# Allegro board board_before_import.brd
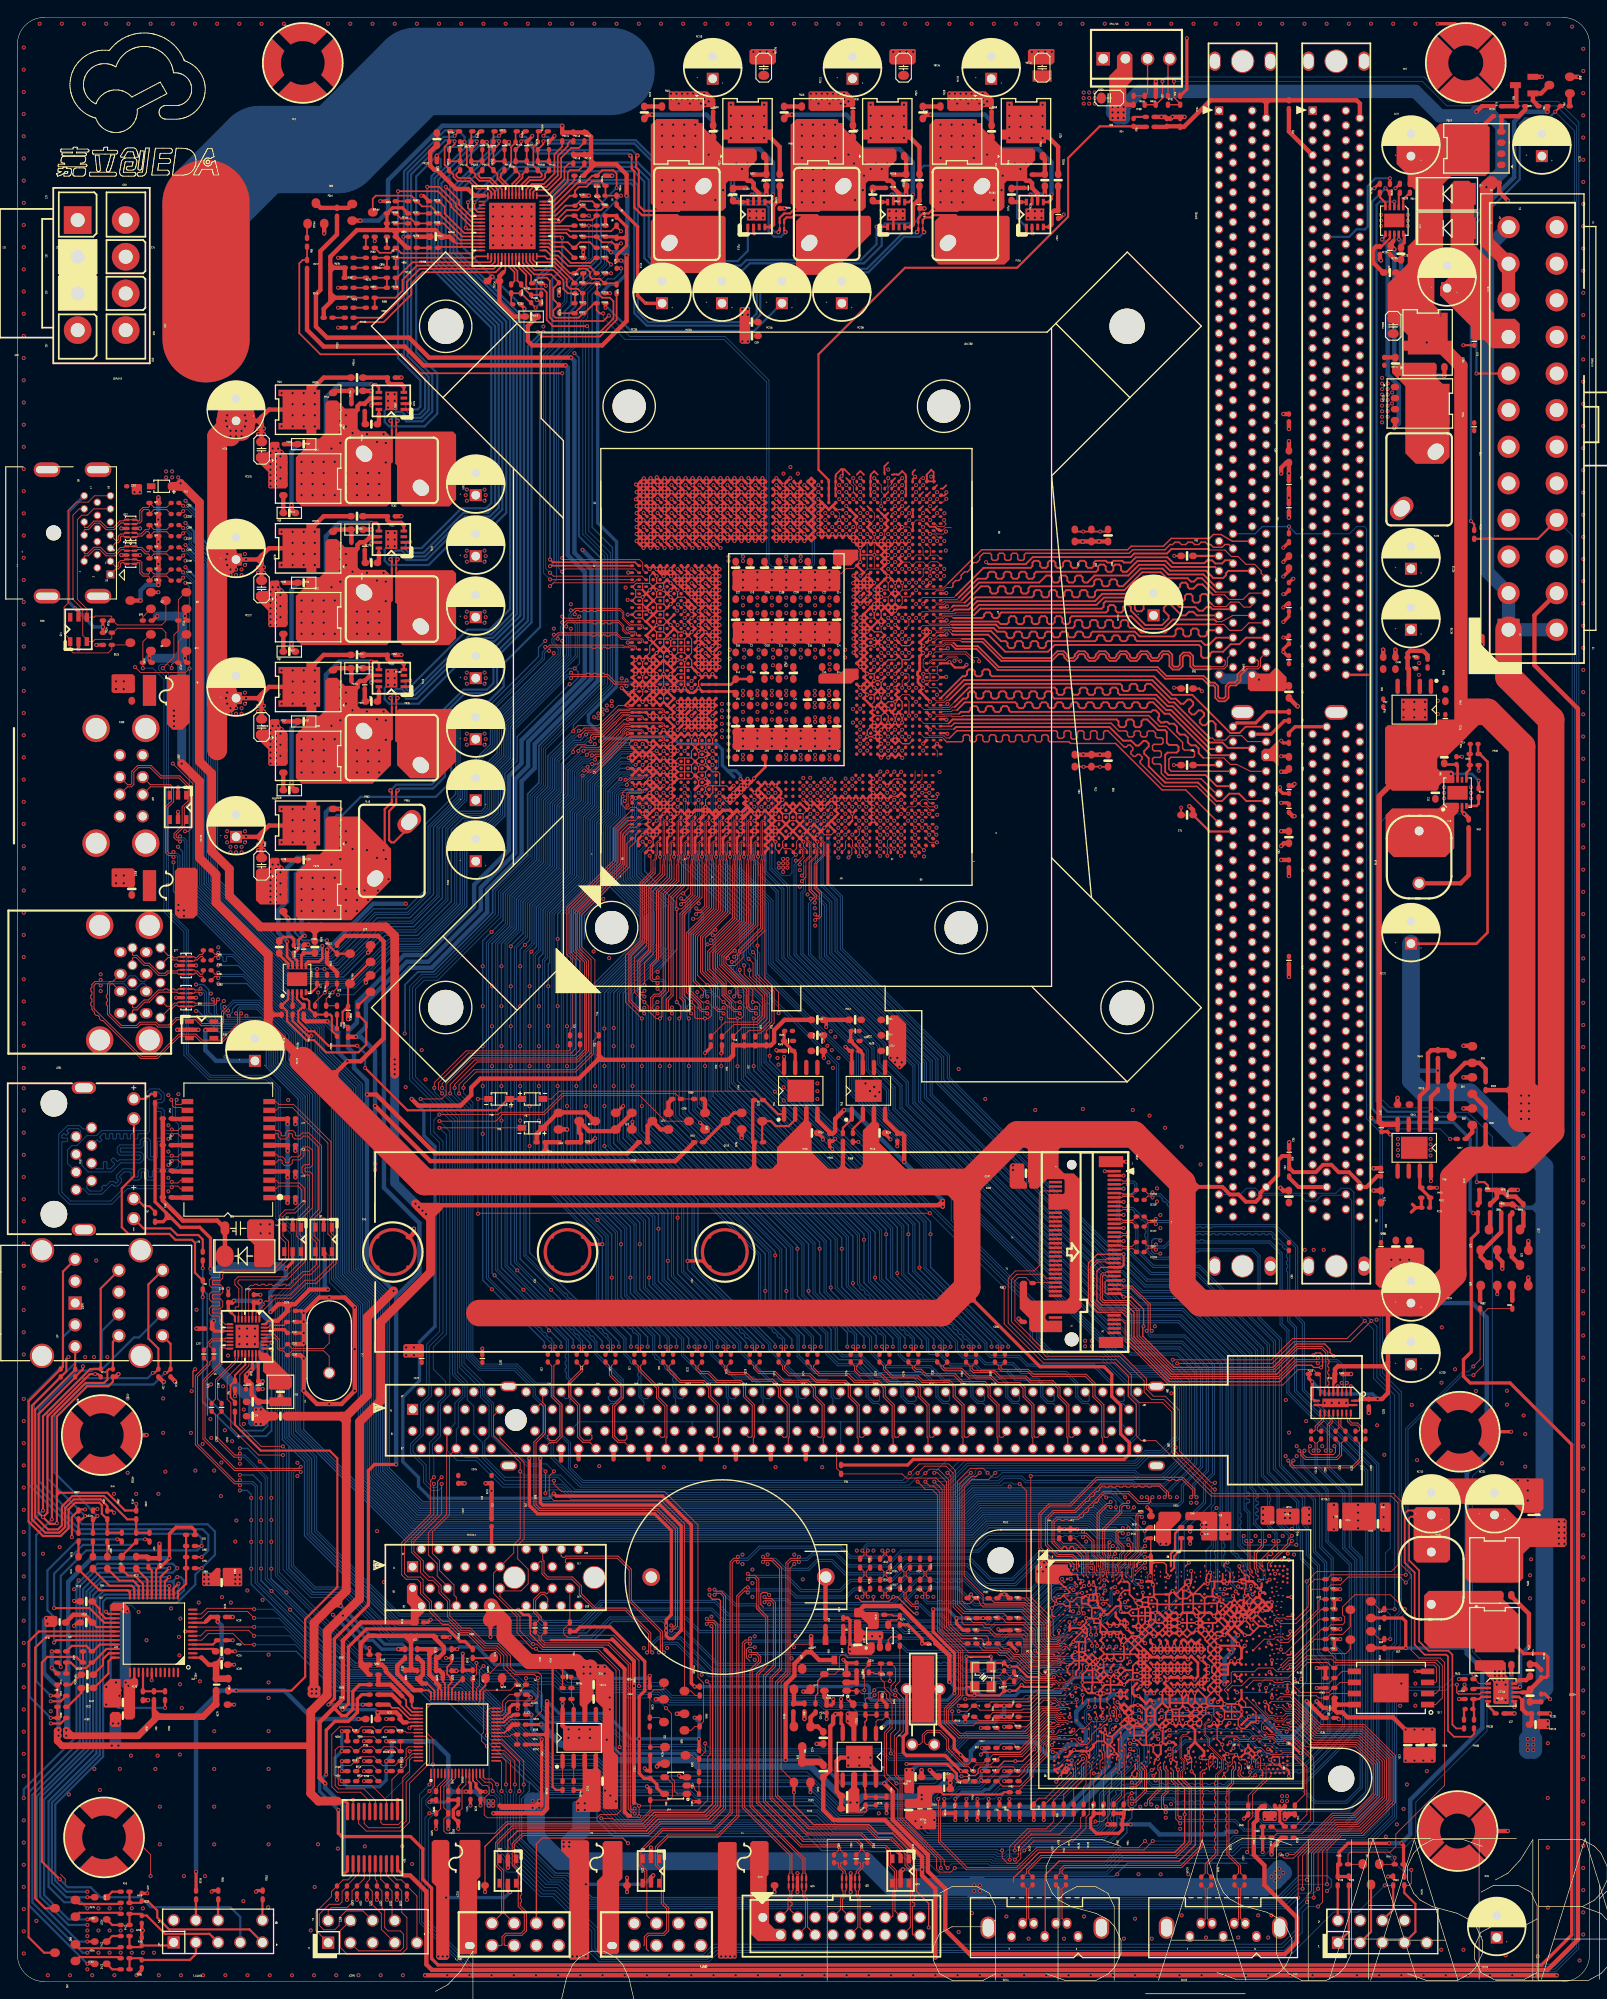
[diagram p0: board, top side]
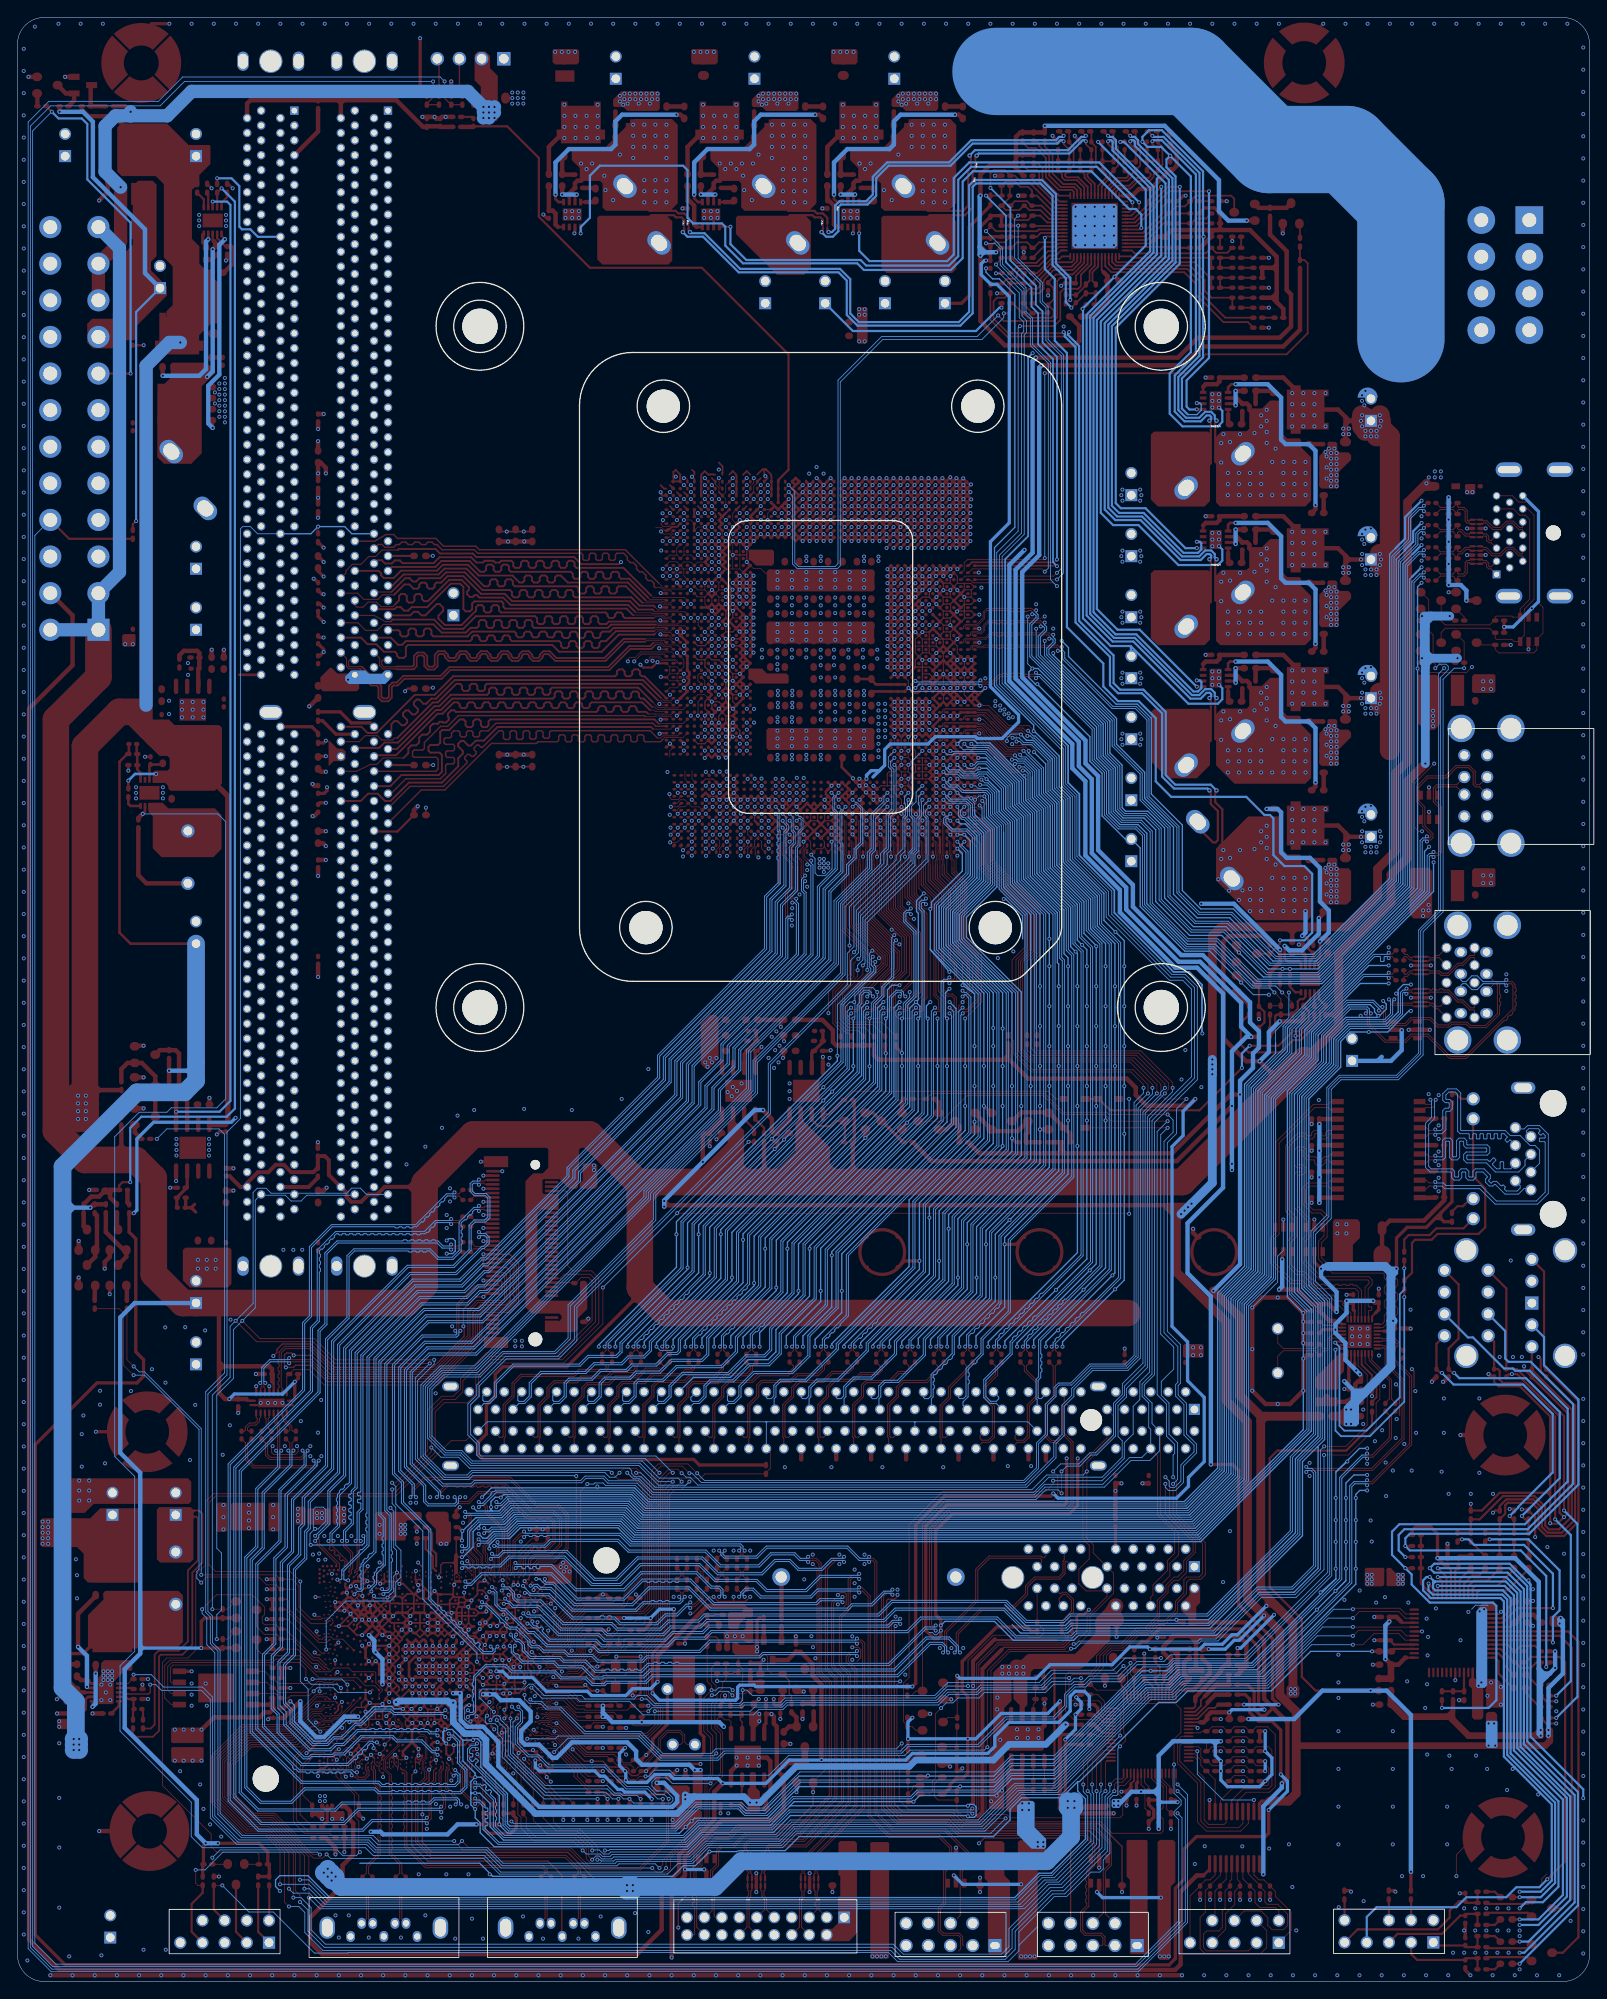
[diagram p1: board, bottom side, seen from below]

Outline 179.95 x 224.87 mm; copper layers: TOP, L2, L3, BOTTOM. Coordinates in mm from the lower left corner of the outline.
Outline path: 0,221.82 arc(0.89,223.98) 3.05,224.87 176.9,224.87 arc(179.06,223.98) 179.95,221.82 179.95,3.05 arc(179.06,0.89) 176.9,0 3.05,0 arc(0.89,0.89) 0,3.05 0,221.82

## Design rules (mm)
constraint set DEFAULT: min track width 0.076

## Placement (name value [footprint] x y rotation side)
AC4  -  [C0603_2]  7.87 43.52 0 top
AC5  -  [C0603_1_8]  11.94 47.96 90 top
AC6  -  [C0603_1_4]  10.29 47.96 90 top
AC7  -  [C0402_11]  4.95 69.68 270 top
AC8  -  [C0402_1_70]  6.6 69.68 270 top
AC11  -  [C0402_1_73]  9.52 69.68 270 top
AC12  -  [C0402_1_71]  10.92 69.68 270 top
AC13  -  [C0603_1_9]  8.64 47.96 90 top
AC14  -  [C0603_1_7]  6.98 47.96 90 top
AC15  -  [C0603_1]  23.37 37.8 0 top
AC16  -  [C0402_1_72]  16.13 69.68 270 top
AC17  -  [C0402_1_69]  17.53 69.68 270 top
AC18  -  [C0603]  23.37 36.28 0 top
AC19  -  [C0402_5]  23.37 41.74 0 top
AC20  -  [C0402_2_6]  12.06 33.36 180 top
AC21  -  [C0603_2_9]  12.06 31.96 180 top
AC22  -  [C0603_1_10]  9.52 7.11 0 top
AC23  -  [C0603_1_11]  9.52 9.65 0 top
AC24  -  [C0402_2_12]  14.22 9.65 90 top
AC25  -  [C0402_2_13]  14.22 7.11 270 top
AC26  -  [C0402_2_5]  23.37 47.07 180 top
AC27  -  [C0603_1_5]  13.59 47.96 90 top
AC28  -  [C0402_2_7]  16.26 47.96 90 top
AC29  -  [C0603_1_6]  23.37 31.71 0 top
AC30  -  [C0603_3_3]  7.87 41.1 180 top
AC104  -  [C0603_3_2]  8 33.61 180 top
AC105  -  [C0603_3_1]  8 35.13 180 top
AFB1  -  [FB0603_2_1]  4.83 41.1 0 top
AFB8  -  [FB0603]  24.13 33.99 90 top
AFB9  -  [FB0603_1_1]  12.06 30.44 0 top
AFB12  -  [FB0603_2_2]  22.73 33.99 270 top
AR2  -  [R0402_16]  19.81 51.14 180 top
AR3  -  [R0402_1_11]  14.99 47.96 90 top
AR4  -  [R0402_2_11]  5.08 37.8 180 top
AR5  -  [R0402_2_12]  8 36.53 0 top
AR7  -  [R0402_13]  8 37.8 0 top
AR8  -  [R0402_14]  5.08 35.26 180 top
AR9  -  [R0402_3_10]  15.62 32.72 270 top
AR36  -  [R0402_1_10]  14.35 32.72 90 top
AR48  -  [R0402_3_29]  12.32 6.48 180 top
AR49  -  [R0402_3_31]  12.32 10.29 180 top
AR71  -  [R0402_1_7]  5.08 32.72 180 top
AR73  -  [R0402_2_17]  13.59 50.88 270 top
AR74  -  [R0402_3_6]  5.08 33.99 0 top
AR75  -  [R0402_3_9]  6.98 50.88 270 top
AR79  -  [R0402_3_7]  5.08 31.45 0 top
AR80  -  [R0402_3_8]  8.64 50.88 270 top
AR82  -  [R0402_2_21]  19.81 49.87 0 top
AR85  -  [R0402_2_18]  11.94 50.88 270 top
AR86  -  [R0402_15]  10.29 53.42 270 top
AR88  -  [R0402_1_8]  6.98 53.42 270 top
AR89  -  [R0402_2_19]  19.81 47.33 0 top
AR90  -  [R0402_2_16]  15.11 50.88 270 top
AR92  -  [R0402_2_13]  5.08 36.53 180 top
AR93  -  [R0402_3_11]  16.89 32.72 270 top
AR94  -  [R0402_2_20]  19.81 48.6 0 top
AR97  -  [R0402_2_15]  10.29 50.88 270 top
AR98  -  [R0402_1_6]  5.08 30.18 180 top
AR103  -  [R0402_2_14]  13.59 53.42 270 top
AR104  -  [R0402_1_9]  8.64 53.42 270 top
ATXPWR1  -  [POWER-PSU-20051014]  176.17 177.82 180 top
ATXPWR2  -  [POWER-2X4P_NHOLD]  6.51 195.33 270 top
AU1  -  [LQFP48]  15.62 39.83 180 top
AU4  -  [QFN60P_7X7MM_GND]  56.64 201 270 top
AUDIO  -  [AUDIO_V]  7.37 77.68 270 top
BAT2  -  [BAT]  81.32 46.31 0 top
BYC3  -  [C0402_1_80]  142.79 19.64 270 top
BYC4  -  [C0402_2]  104.69 38.69 180 top
C1  -  [C0603_2_31]  87.16 149.82 270 top
C2  -  [C0603_1_12]  83.86 152.86 90 top
C3  -  [C0603_2_26]  88.81 161.88 270 top
C4  -  [C0603_2_10]  83.86 161.88 270 top
C5  -  [C0603_2_32]  85.51 149.82 270 top
C6  -  [C0603_2_45]  93.77 143.72 270 top
C7  -  [C0603_1_13]  88.81 152.86 90 top
C8  -  [C0603_1_14]  92.12 152.86 90 top
C9  -  [C0603_9]  84.07 189.99 180 top
C10  -  [C0603_2_38]  90.46 155.91 270 top
C11  -  [C0603_2_27]  87.16 161.88 270 top
C12  -  [C0603_1_15]  92.12 158.96 90 top
C13  -  [C0603_2_25]  90.46 161.88 270 top
C14  -  [C0603_1_16]  93.77 158.96 90 top
C15  -  [C0603_1_17]  87.16 152.86 90 top
C16  -  [C0603_2_34]  83.86 155.91 270 top
C17  -  [C0603_2_30]  88.81 149.82 270 top
C18  -  [C0603_1_18]  82.21 152.86 90 top
C19  -  [C0603_3_6]  84.07 188.42 180 top
C20  -  [C0603_1_19]  90.46 158.96 90 top
C21  -  [C0603_2_24]  92.12 161.88 270 top
C22  -  [C0603_1_20]  82.21 158.96 90 top
C23  -  [C0603_2_28]  85.51 161.88 270 top
C24  -  [C0603_1_21]  93.77 152.86 90 top
C25  -  [C0603_1_22]  92.12 140.8 90 top
C26  -  [C0603_1_23]  93.77 140.8 90 top
C27  -  [C0603_2_13]  92.08 146.77 270 top
C28  -  [C0603_1_24]  88.81 140.8 90 top
C29  -  [C0603_1_25]  90.46 140.8 90 top
C30  -  [C0603_1_26]  87.16 140.8 90 top
C31  -  [C0603_2_12]  93.73 146.77 270 top
C32  -  [C0603_2_29]  82.21 161.88 270 top
C33  -  [C0603_2_33]  82.21 155.91 270 top
C34  -  [C0603_2_39]  92.12 155.91 270 top
C35  -  [C0603_2_48]  88.81 143.72 270 top
C36  -  [C0603_1_27]  90.46 152.86 90 top
C37  -  [C0603_2_41]  87.16 143.72 270 top
C38  -  [C0603_2_40]  93.77 155.91 270 top
C40  -  [C0603_1_28]  83.86 158.96 90 top
C41  -  [C0603_1_29]  88.81 146.77 90 top
C42  -  [C0603_2_23]  93.77 161.88 270 top
C43  -  [C0603_1_30]  82.21 149.82 90 top
C44  -  [C0603_1_31]  93.77 149.82 90 top
C45  -  [C0603_1_32]  92.12 149.82 90 top
C46  -  [C0603_2_11]  90.42 146.77 270 top
C48  -  [C0603_2_47]  90.46 143.72 270 top
C49  -  [C0603_2_42]  85.51 143.72 270 top
C50  -  [C0603_2_46]  92.12 143.72 270 top
C51  -  [C0603_1_33]  85.51 146.77 90 top
C52  -  [C0603_1_34]  83.86 140.8 90 top
C53  -  [C0603_2_43]  83.86 143.72 270 top
C54  -  [C0603_2_44]  82.21 143.72 270 top
C55  -  [C0603_1_35]  82.21 146.77 90 top
C56  -  [C0603_1_36]  87.16 146.77 90 top
C57  -  [C0603_1_37]  83.86 146.77 90 top
C58  -  [C0603_1_38]  82.21 140.8 90 top
C59  -  [C0603_1_39]  85.51 140.8 90 top
C60  -  [C0603_2_15]  124.84 139.78 270 top
C61  -  [C0603_10]  133.88 139.27 180 top
C62  -  [C0603_1_40]  121.03 165.56 90 top
C63  -  [C0603_11]  133.88 148.04 180 top
C64  -  [C0603_12]  133.88 163.23 180 top
C65  -  [C0603_1_41]  122.94 165.56 90 top
C66  -  [C0402_2_24]  127.76 212.85 90 top
C67  -  [C0402_1_57]  131.57 212.85 90 top
C68  -  [C0603_1_42]  145.54 139.53 90 top
C69  -  [C0603_1_43]  145.54 174.58 270 top
C70  -  [C0402_3_27]  145.54 157.31 90 top
C71  -  [C0402_1_63]  145.54 179.03 90 top
C72  -  [C0402_3_28]  145.54 153.63 90 top
C73  -  [C0402_3_26]  145.54 116.92 90 top
C74  -  [C0402_3_30]  145.54 136.48 270 top
C75  -  [C0603_13]  133.88 133.56 0 top
C76  -  [C0603_1_44]  122.94 139.78 90 top
C77  -  [C0603_2_16]  145.54 147.66 270 top
C78  -  [C0402_3_29]  145.54 151.34 90 top
C79  -  [C0402_3_36]  156.08 92.67 90 top
C80  -  [C0603_1_45]  156.08 89.87 90 top
C81  -  [C0402_3_37]  156.08 84.16 270 top
C82  -  [C0603_1_46]  145.54 162.52 90 top
C83  -  [C0603_1_47]  121.03 139.78 90 top
C84  -  [C0402_1_61]  145.54 127.97 270 top
C85  -  [C0402_3_32]  145.54 168.74 270 top
C86  -  [C0402_3_34]  145.54 171.41 90 top
C87  -  [C0402_1_62]  145.54 159.72 90 top
C88  -  [C0402_3_31]  145.54 134.32 90 top
C89  -  [C0603_2_14]  124.84 165.56 270 top
C90  -  [C0603_2_17]  145.54 131.02 90 top
C91  -  [C0603_1_48]  156.34 150.96 90 top
C92  -  [C0402_1_64]  156.34 146.39 270 top
C93  -  [C0402_3_35]  145.57 94.95 90 top
C94  -  [C0603_2_19]  145.54 89.87 90 top
C95  -  [C0402_1_67]  145.54 84.16 270 top
C98  -  [C0402_2_39]  109.01 25.36 0 top
C99  -  [C0402_12]  109.01 24.09 0 top
C100  -  [C0402_3_49]  150.24 31.32 0 top
C101  -  [C0603_3]  99.57 110.11 0 top
C102  -  [C0603_1_49]  85.51 152.86 90 top
C103  -  [C0402_2_2]  114.09 24.09 180 top
C104  -  [C0603_2_35]  85.51 155.91 270 top
C105  -  [C0603_1_50]  85.51 158.96 90 top
C106  -  [C0603_1_51]  83.86 149.82 90 top
C107  -  [C0603_3_7]  92.24 24.09 90 top
C108  -  [C0603_1_52]  87.16 158.96 90 top
C109  -  [C0603_1_53]  88.81 158.96 90 top
C110  -  [C0603_2_36]  87.16 155.91 270 top
C111  -  [C0603_2_37]  88.81 155.91 270 top
C141  -  [C0402_3_50]  90.85 38.18 90 top
C187  -  [C0402_2_55]  78.02 21.04 270 top
C188  -  [C0402_2_54]  96.05 36.02 90 top
C194  -  [C0402_13]  18.03 160.4 0 top
C195  -  [C0402_14]  18.03 161.67 0 top
C196  -  [C0402_15]  18.03 164.21 0 top
C197  -  [C0402_16]  18.03 165.48 0 top
C198  -  [C0402_17]  18.03 162.94 0 top
C199  -  [C0402_18]  18.03 166.75 0 top
C200  -  [C0402_19]  18.03 168.02 0 top
C201  -  [C0402_20]  18.03 169.29 0 top
C202  -  [C0402_21]  12.95 171.2 0 top
C221  -  [C0603_1_54]  85.98 11 0 top
C223  -  [C0603_2_21]  52.83 11 0 top
C224  -  [C0603_1_55]  69.09 11 0 top
C225  -  [C0402_1_46]  112.94 36.02 90 top
C226  -  [C0603_14]  26.92 64.73 0 top
C227  -  [C0402_22]  21.84 74.76 0 top
C228  -  [C0402_3_47]  27.56 68.28 90 top
C229  -  [C0402_2_32]  31.37 76.79 180 top
C230  -  [C0402_23]  31.37 71.71 0 top
C231  -  [C0402_24]  31.37 72.98 0 top
C232  -  [C0603_3_8]  26.92 66.38 0 top
C233  -  [C0402_3_46]  26.16 68.28 90 top
C234  -  [C0402_2_31]  31.37 74.25 180 top
C235  -  [C0402_1_74]  27.05 78.19 270 top
C236  -  [C0402_1_75]  24.13 78.19 270 top
C237  -  [C0402_3_43]  21.34 71.84 90 top
C238  -  [C0402_3_42]  22.48 71.84 90 top
C239  -  [C0402_3_45]  22.23 65.74 90 top
C240  -  [C0402_3_44]  23.37 65.74 90 top
C241  -  [C0603_1_56]  9.52 4.57 0 top
C242  -  [C0603_1_57]  9.52 2.03 0 top
C243  -  [C0402_2_14]  14.22 4.57 90 top
C244  -  [C0402_2_15]  14.22 2.03 270 top
C245  -  [C0603_2_22]  66.97 22.94 0 top
C246  -  [C0402_3_7]  112.94 33.74 270 top
C273  -  [C0402_25]  57.7 31.71 180 top
C274  -  [C0603_3_9]  92.24 27.9 270 top
C313  -  [C0402_2_56]  72.43 23.7 90 top
C314  -  [C0402_2_52]  92.62 31.2 270 top
C319  -  [C0402_2_35]  36.58 10.5 270 top
C320  -  [C0402_26]  38.86 10.5 270 top
C321  -  [C0402_27]  41.15 10.5 270 top
C322  -  [C0402_2_36]  37.72 10.5 270 top
C323  -  [C0402_28]  43.43 10.5 270 top
C324  -  [C0402_29]  40.01 10.5 270 top
C325  -  [C0402_1_47]  154.69 66.25 270 top
C326  -  [C0402_2_33]  115.7 91.14 180 top
C327  -  [C0402_30]  42.29 10.5 270 top
C328  -  [C0402_31]  44.58 10.5 270 top
C329  -  [C0402_6]  64.9 96.09 0 top
C330  -  [C0603_3_10]  115.44 92.54 180 top
C333  -  [C0402_3_6]  53.21 71.33 90 top
C334  -  [C0402_8]  151.26 69.55 0 top
C350  -  [C0402_2_34]  115.7 75.52 180 top
C358  -  [C0603_15]  13.08 125.09 90 top
C359  -  [C0603_1_58]  13.08 147.32 90 top
C360  -  [C0402_1_49]  93.47 14.05 270 top
C361  -  [C0402_1_48]  94.74 14.05 270 top
C362  -  [C0402_3_41]  96.01 14.05 90 top
C363  -  [C0402_3_8]  97.28 14.05 90 top
C380  -  [C0402_2_21]  48.01 207.9 90 top
C381  -  [C0603_2_53]  96.18 38.56 90 top
C382  -  [C0603_1_59]  96.18 41.61 270 top
C383  -  [C0402_32]  21.72 114.64 0 top
C384  -  [C0402_33]  21.72 115.78 0 top
C385  -  [C0402_34]  21.72 116.92 0 top
C386  -  [C0402_35]  21.72 118.07 0 top
C491  -  [C0603_1_60]  163.45 147.28 90 top
C492  -  [C0402_3_48]  156.12 97.75 90 top
C493  -  [C0603_2_49]  157.77 84.16 270 top
C494  -  [C0603_2_50]  159.3 84.16 270 top
C495  -  [C0603_1_61]  158.66 100.41 180 top
C496  -  [C0603_1_62]  157.73 150.96 90 top
C635  -  [C0805]  124.97 215.65 0 top
CC1  -  [C0603_2_18]  162.31 136.1 270 top
CN1  -  [SMD_BD5_6-D3_6]  62.97 83.52 90 top
CN2  -  [SMD_BD5_6-D3_6_1]  80.96 83.52 90 top
CN3  -  [SMD_BD5_6-D3_6_2]  42.97 83.52 0 top
CPU1  -  [LGA1700-HS]  88.02 150.52 90 top
CPU_FAN  -  [FAN4P]  128.09 220.21 0 top
D2  -  [DIODE_1N5817_4148]  163.7 200.74 0 top
D4  -  [SOT23_123_2]  154.94 12.27 180 top
D5  -  [DIODE_1N5817_4148_1]  163.7 204.68 0 top
D67  -  [SOT23_124_1]  5.46 3.3 90 top
D69  -  [SOT23_124]  5.46 8.38 90 top
D85  -  [SOT23_125_2]  89.83 23.96 0 top
DIMMA1  -  [DDR4-288P-AKL_1]  140.24 150.91 270 top
DIMMB1  -  [DDR4-288P-AKL_1_1]  150.96 150.91 270 top
EC1  -  [C0402_1_13]  61.85 71.37 270 top
EC2  -  [C0402_1_11]  60.71 71.37 270 top
EC3  -  [C0402_1_14]  65.15 71.37 270 top
EC4  -  [C0402_1_12]  64.01 71.37 270 top
EC5  -  [C0402_1_37]  68.45 71.37 270 top
EC6  -  [C0402_1_20]  67.31 71.37 270 top
EC7  -  [C0402_1_29]  70.61 71.37 270 top
EC8  -  [C0402_1_31]  71.75 71.37 270 top
EC9  -  [C0402_1_35]  73.91 71.37 270 top
EC10  -  [C0402_1_18]  75.06 71.37 270 top
EC11  -  [C0402_1_25]  77.22 71.37 270 top
EC12  -  [C0402_1_16]  78.36 71.37 270 top
EC13  -  [C0402_1_30]  80.52 71.37 270 top
EC14  -  [C0402_1_15]  81.66 71.37 270 top
EC17  -  [C0402_1_52]  46.05 41.12 0 top
EC19  -  [C0402_1_22]  83.82 71.37 270 top
EC20  -  [C0402_1_81]  54.27 52.53 90 top
EC22  -  [C0402_1_7]  50.46 57.49 270 top
EC23  -  [C0402_3_5]  46.27 71.33 90 top
EC24  -  [C0402_1_17]  91.57 71.37 270 top
EC25  -  [C0402_1_44]  152.02 62.57 270 top
EC26  -  [C0402_1_43]  150.88 62.57 270 top
EC27  -  [C0402_1_45]  153.16 62.57 270 top
EC28  -  [C0402_1_40]  154.3 62.57 270 top
EC37  -  [C0402_2_44]  140.46 11.51 90 top
EC38  -  [C0402_2_43]  139.32 11.51 90 top
EC39  -  [C0402_2_42]  136.65 11.51 90 top
EC40  -  [C0402_2_41]  135.51 11.51 90 top
EC41  -  [C0402_2_46]  120.02 11.51 90 top
EC42  -  [C0402_2_45]  118.87 11.51 90 top
EC43  -  [C0402_2_48]  116.2 11.51 90 top
EC44  -  [C0402_2_47]  115.06 11.51 90 top
EC45  -  [C0402_1_6]  54.27 57.49 270 top
EC46  -  [C0402_1_28]  84.96 71.37 270 top
EC47  -  [C0402_1_39]  106.43 71.37 270 top
EC49  -  [C0402_1_76]  54.14 40.98 270 top
EC57  -  [C0402_2_27]  128.52 84.66 180 top
EC68  -  [C0402_1_33]  88.27 71.37 270 top
EC69  -  [C0402_1_23]  99.82 71.37 270 top
EC72  -  [C0402_1_38]  87.12 71.37 270 top
EC73  -  [C0402_1_32]  96.52 71.37 270 top
EC74  -  [C0402_1_24]  90.42 71.37 270 top
EC75  -  [C0402_1_34]  98.68 71.37 270 top
EC76  -  [C0402_1_27]  95.38 71.37 270 top
EC77  -  [C0402_1_26]  103.12 71.37 270 top
EC78  -  [C0402_1_19]  101.98 71.37 270 top
EC79  -  [C0402_1_10]  113.03 71.37 270 top
EC80  -  [C0402_1_9]  109.73 71.37 270 top
EC81  -  [C0402_1_36]  105.28 71.37 270 top
EC82  -  [C0402_1_8]  111.89 71.37 270 top
EC83  -  [C0402_1_21]  108.59 71.37 270 top
EC87  -  [C0402_1_42]  149.22 62.57 270 top
EC110  -  [C0402_2_28]  128.52 83.52 180 top
EC112  -  [C0402_2_30]  128.52 86.44 180 top
EC115  -  [C0402_2_29]  128.52 87.59 180 top
EC116  -  [C0402_2_25]  128.52 90.63 180 top
EC119  -  [C0402_2_26]  128.52 89.49 180 top
EC120  -  [C0402_1_41]  148.08 62.57 270 top
ECT6  -  [EC1P25C_2]  163.64 195.15 90 top
ECT7  -  [EC1P25C_2_1]  159.51 210.27 90 top
ECT9  -  [EC1P25C_2_2]  159.51 78.95 90 top
ECT10  -  [EC1P25C_2_3]  169.33 6.31 90 top
ECT11  -  [EC1P25C_2_4]  174.5 210.27 90 top
ECT20  -  [EC1P25C_2_5]  159.51 71.93 90 top
F4  -  [MINISMDC110]  83.19 14.18 0 top
F5  -  [MINISMDC110_1]  50.16 14.18 0 top
F6  -  [MINISMDC110_2]  66.29 14.18 0 top
F7  -  [MINISMDC110_3]  17.02 125.48 0 top
F8  -  [MINISMDC110_4]  17.02 147.83 0 top
F_AUDIO1  -  [PIN2X5_2D54_NC8]  22.96 5.75 0 top
F_USB1  -  [HDR-TH_10P-P2_54_210-82-05GB04]  56.86 5.39 0 top
F_USB2  -  [HEADER10X2_2MM_USB3_A]  94.32 6.34 0 top
F_USB3  -  [unnamed]  73.15 5.39 0 top
FB1  -  [FB0603_1_2]  40.55 30.05 0 top
FB23  -  [FB0603_1]  133.48 53.3 180 top
FB24  -  [FB0603_2_3]  106.09 22.05 0 top
FB25  -  [FB0603_2]  102.8 22.03 180 top
FC1  -  [C0402_1_60]  169.16 205.95 0 top
FC3  -  [C0402_3_24]  166.75 178.01 90 top
FC4  -  [C0402_1_65]  166.75 154.39 270 top
FC5  -  [C0402_3_23]  166.75 187.79 270 top
GR1  -  [R0402_2_50]  15.62 169.29 0 top
GR2  -  [R0402_2_54]  15.62 168.02 0 top
GR3  -  [R0402_2_55]  15.62 166.75 0 top
GR4  -  [R0402_2_56]  15.62 165.48 0 top
GR5  -  [R0402_2_57]  15.62 164.21 0 top
GR6  -  [R0402_2_53]  15.62 162.94 0 top
GR7  -  [R0402_2_51]  15.62 161.67 0 top
GR8  -  [R0402_2_52]  15.62 160.4 0 top
GR9  -  [R0402_3_44]  14.86 155.83 180 top
HDMI  -  [HDMI3F19_2H61_AKL]  4.99 165.86 270 top
JCOM1  -  [PIN2X5_2D54_NC10]  40.65 5.71 0 top
JFP1  -  [PIN2X5_2D54_NC10_1]  156.24 5.72 0 top
LAN1  -  [RJ45_LED]  7.09 94.2 270 top
LC1  -  [C0402_36]  31.37 98.81 0 top
LC2  -  [C0402_37]  31.37 95.76 0 top
LC3  -  [C0402_38]  31.37 92.71 0 top
LC4  -  [C0402_39]  31.37 89.79 0 top
LC5  -  [C1206]  25.27 86.23 180 top
LL1  -  [L1210H22]  30.1 67.52 0 top
LQ1  -  [SOT23-6P-20051228]  35.05 84.96 180 top
LQ2  -  [SOT23-6P-20051228_1]  31.5 84.96 180 top
LR1  -  [R0603_2]  30.1 64.73 180 top
LR2  -  [R0402_120]  31.37 75.52 180 top
LR3  -  [R0603_1_1]  30.1 67.52 270 top
LR4  -  [R0402_1_70]  24.89 65.74 90 top
LR5  -  [R0402_3_74]  24.89 68.28 270 top
LR6  -  [R0402_3_39]  21.21 83.06 270 top
LR7  -  [R0402_1_24]  15.75 87.5 270 top
LR8  -  [R0402_1_28]  21.21 79.76 90 top
LR9  -  [R0402_1_25]  15.75 101.09 270 top
LR11  -  [R0402_3_38]  17.14 89.79 180 top
LR12  -  [R0402_1_23]  17.14 92.84 180 top
LR13  -  [R0402_1_26]  17.14 95.76 180 top
LR14  -  [R0402_1_27]  17.14 98.81 180 top
LU1  -  [TRAN24_100_150]  24.13 95.25 90 top
LY1  -  [XD2]  35.69 74.76 270 top
MC6  -  [C0402_1_66]  164.72 139.78 270 top
MC97  -  [C0402_1_68]  31.62 118.19 270 top
MC98  -  [C0402_2_11]  30.1 128.4 180 top
MC99  -  [C0402_3_39]  32.77 118.19 90 top
MC100  -  [C0402_2_40]  174.41 35.26 270 top
MC101  -  [C0402_10]  173.78 30.69 0 top
MC102  -  [C0402_1_78]  174.41 32.47 90 top
MC103  -  [C0402_1_58]  156.46 185.5 270 top
MC104  -  [C0402_1_59]  155.96 198.2 270 top
MC105  -  [C0402_3_25]  157.1 198.2 90 top
MCT11  -  [EC1P25C_2_18]  52.45 129.54 90 top
MCT12  -  [EC1P25C_2_6]  161.84 54.69 90 top
MCT13  -  [EC1P25C_2_7]  159.51 163.02 90 top
MCT14  -  [EC1P25C_2_12]  52.45 136.53 90 top
MCT15  -  [EC1P25C_2_8]  130.05 157.69 90 top
MCT16  -  [EC1P25C_2_9]  159.51 156.04 90 top
MCT20  -  [EC1P25C_2_10]  25.02 132.33 90 top
MCT21  -  [EC1P25C_2_11]  169.08 54.69 90 top
MH1  -  [MTH_156A]  32.66 219.67 0 top
MH2  -  [MTH_156A_1]  165.1 62.95 0 top
MH3  -  [MTH_156A_2]  9.91 16.5 0 top
MH4  -  [MTH_156A_3]  9.65 62.57 0 top
MH5  -  [MTH_156A_1_1]  164.85 17.23 0 top
MH7  -  [MTH_156A_2_1]  165.79 219.67 0 top
MR1  -  [R0603_1_2]  163.32 140.16 90 top
MR2  -  [R0402_1_80]  166.12 132.54 90 top
MR3  -  [R0402_113]  166.75 139.27 180 top
MR13  -  [R0402_3_25]  98.34 31.07 270 top
MR107  -  [R0402_115]  34.07 111.22 270 top
MR108  -  [R0603_2_3]  29.97 118.45 90 top
MR109  -  [R0603_3]  32.77 128.4 0 top
MR110  -  [R0603_2_4]  34.04 118.45 90 top
MR111  -  [R0402_2_100]  35.43 114.76 270 top
MR112  -  [R0402_3_71]  38.99 111.21 90 top
MR113  -  [R0402_35]  166.16 32.34 0 top
MR114  -  [R0603]  173.14 35.64 90 top
MR115  -  [R0603_2_2]  173.14 32.72 90 top
MR116  -  [R0603_1]  173.78 29.42 0 top
MR117  -  [R0603_1_3]  157.73 185.25 270 top
MR118  -  [R0402_3_80]  170.47 90.63 180 top
MR119  -  [R0603_1_4]  157.1 195.66 0 top
MR120  -  [R0603_1_5]  158.37 197.82 270 top
PC11  -  [C0402_3_40]  95.89 108.84 0 top
PC12  -  [C0603_3_5]  99.57 106.55 0 top
PC13  -  [C0603_3_4]  95.89 110.11 180 top
PC14  -  [C0603_4]  99.57 108.33 0 top
PC15  -  [C0603_8]  98.68 97.16 0 top
PC16  -  [C0603_6]  91.57 110.11 0 top
PC17  -  [C0603_5]  91.57 108.33 0 top
PC18  -  [C0603_2_20]  91.57 106.55 0 top
PC19  -  [C0402_7]  88.27 108.84 0 top
PC20  -  [C0603_7]  90.93 97.16 0 top
PC22  -  [C0402_3_33]  163.45 144.61 90 top
PC23  -  [C0402_40]  159.64 150.32 0 top
PC24  -  [C0402_2_49]  161.2 88.6 180 top
PC25  -  [C0603_2_51]  94.97 19.81 180 top
PC26  -  [C0402_1_82]  98.27 20.66 270 top
PC28  -  [C0402_1_51]  100.71 96.65 90 top
PC29  -  [C0402_2_18]  68.58 196.6 270 top
PC30  -  [C0402_41]  66.8 194.44 180 top
PC31  -  [C0402_1_50]  92.96 96.65 90 top
PC32  -  [C0805_1]  27.94 127.76 90 top
PC33  -  [C0402_2_53]  94.27 31.07 270 top
PC34  -  [C0603_1_63]  95.67 31.07 90 top
PC35  -  [C0603_2_52]  94.97 21.26 180 top
PC36  -  [C0805_1_1]  173.65 53.42 270 top
PC37  -  [C0603_3_11]  65.95 32.34 0 top
PC38  -  [C0603_3_12]  65.95 33.99 0 top
PC57  -  [C0402_2_9]  30.1 144.27 180 top
PC58  -  [C0402_2_10]  30.1 160.15 180 top
PC59  -  [C0402_2_8]  30.1 176.02 180 top
PC60  -  [C0402_3_19]  79.63 214.5 90 top
PC61  -  [C0402_3_20]  95.63 214.5 90 top
PC62  -  [C0402_42]  42.8 151.89 0 top
PC63  -  [C0402_43]  42.8 167.77 0 top
PC64  -  [C0402_1_54]  42.8 183.64 0 top
PC65  -  [C0402_44]  87.25 203.45 270 top
PC66  -  [C0402_3_22]  103.25 203.45 270 top
PC67  -  [C0402_3_18]  119.13 202.31 270 top
PC68  -  [C0402_3_21]  111.51 214.5 90 top
PC92  -  [C0402_3_51]  62.91 34.88 180 top
PC105  -  [C0402_45]  169.42 213.57 0 top
PC151  -  [C0402_46]  64.26 204.47 0 top
PC152  -  [C0402_47]  61.98 194.06 270 top
PC155  -  [C0603_1_64]  54.48 194.69 0 top
PC167  -  [C0402_3_13]  54.48 210.19 270 top
PC168  -  [C0402_3_15]  51.94 210.19 270 top
PC169  -  [C0402_3_9]  39.75 148.46 90 top
PC170  -  [C0805_2]  27.94 143.64 90 top
PC171  -  [C0402_3_10]  39.75 164.34 90 top
PC172  -  [C0805_3]  27.94 159.51 90 top
PC173  -  [C0402_48]  49.4 210.19 270 top
PC174  -  [C0402_1_53]  39.75 180.21 90 top
PC175  -  [C0805_4]  27.94 175.39 90 top
PC176  -  [C0402_1_55]  57.02 210.19 270 top
PC177  -  [C0402_2_23]  83.82 205.36 0 top
PC178  -  [C0805_5]  85.43 219.13 270 top
PC179  -  [C0402_2_16]  59.56 210.19 270 top
PC180  -  [C0402_49]  99.82 205.36 0 top
PC181  -  [C0805_6]  101.43 219.13 270 top
PC182  -  [C0402_1_56]  58.8 192.66 270 top
PC183  -  [C0402_3_17]  115.7 205.36 0 top
PC184  -  [C0805_2_1]  117.3 219.13 270 top
PC185  -  [C0805_7]  157.48 189.57 90 top
PC226  -  [C0402_2_17]  66.8 204.47 0 top
PC229  -  [C0402_2_22]  45.21 199.77 180 top
PC230  -  [C0402_2_20]  61.98 191.52 90 top
PC231  -  [C0402_2_19]  64.26 193.29 0 top
PC232  -  [C0402_50]  64.26 203.33 0 top
PC233  -  [C0402_51]  57.15 192.02 0 top
PC235  -  [C0402_52]  60.83 210.19 90 top
PC237  -  [C0402_3_14]  55.75 210.19 90 top
PC239  -  [C0402_3_12]  53.21 210.19 90 top
PC240  -  [C0402_3_16]  50.67 210.19 90 top
PC241  -  [C0402_3_11]  58.29 210.19 90 top
PC243  -  [C0402_53]  66.8 193.29 0 top
PC244  -  [C0402_2_57]  72.43 26.37 270 top
PC245  -  [C0402_3_38]  37.85 111.21 270 top
PCH2  -  [BGA1045_28X25MM-ADL]  132.03 35.72 0 top
PCIEX1_1  -  [3GIO_X1-20060619]  55.97 46.26 90 top
PCT7  -  [EC1P25C_2_19]  25.02 148.21 90 top
PCT8  -  [EC1P25C_2_20]  25.02 164.08 90 top
PCT9  -  [EC1P25C_1]  25.02 179.96 90 top
PCT10  -  [EC1P25C_2_21]  79.58 219.13 90 top
PCT11  -  [EC1P25C_2_22]  95.59 219.13 90 top
PCT12  -  [EC1P25C_2_23]  111.46 219.13 90 top
PCT16  -  [EC1P25C_2_24]  87.5 193.42 90 top
PCT21  -  [EC1P25C_2_25]  159.51 120.1 90 top
PCT23  -  [EC1P25C_2_26]  27.18 106.68 90 top
PCT28  -  [EC1P25C_2_27]  94.36 193.42 90 top
PCT29  -  [EC1P25C_2_14]  52.45 150.5 90 top
PCT30  -  [EC1P25C_2_15]  52.45 157.48 90 top
PCT31  -  [EC1P25C_2_13]  52.45 143.51 90 top
PCT32  -  [EC1P25C_2_16]  52.45 164.47 90 top
PCT33  -  [EC1P25C_2_28]  80.64 193.42 90 top
PCT34  -  [EC1P25C_2_17]  52.45 171.45 90 top
PCT35  -  [EC1P25C_2_29]  73.79 193.42 90 top
PD3  -  [1N4148WS-7-SOD323]  16.51 171.2 180 top
PD5  -  [DIODE_1N5817]  26.03 83.06 0 top
PD6  -  [1N4148WS-7-SOD323_1]  58.93 97.75 180 top
PD7  -  [1N4148WS-7-SOD323_1_1]  58.93 101.05 0 top
PD8  -  [1N4148WS-7-SOD323_2]  55.12 101.05 180 top
PEX16_1  -  [3GIO_X16_AIR_KORTAK_AKL]  155.72 51.2 90 top
PL10  -  [MAGIC_R22]  42.93 141.22 270 top
PL11  -  [MAGIC_R22_1]  42.93 157.1 270 top
PL12  -  [MAGIC_R22_2]  42.93 172.97 270 top
PL13  -  [MAGIC_R22_3]  76.58 202.31 180 top
PL14  -  [MAGIC_R22_4]  92.58 202.31 180 top
PL15  -  [MAGIC_R22_5]  108.46 202.31 180 top
PL16  -  [MAGIC_R22_6]  42.9 129.54 0 top
PL18  -  [MAGIC_R22_7]  160.4 171.91 180 top
PL19  -  [CHOKE2U8-20A_3P]  160.45 128.73 90 top
PL20  -  [CHOKE2U8-20A_3P_1]  161.84 46.18 270 top
PQ7  -  [PRPAK5X6_1_1]  33.27 148.21 180 top
PQ8  -  [PRPAK5X6]  33.27 140.34 0 top
PQ9  -  [PRPAK5X6_1_2]  33.27 164.08 180 top
PQ10  -  [PRPAK5X6_1]  33.27 156.21 0 top
PQ11  -  [PRPAK5X6_1_3]  33.27 179.96 180 top
PQ12  -  [PRPAK5X6_2]  33.27 172.09 0 top
PQ13  -  [PRPAK5X6_2_1]  83.57 211.84 90 top
PQ14  -  [PRPAK5X6_3_1]  75.69 211.84 270 top
PQ15  -  [PRPAK5X6_4_1]  99.57 211.84 90 top
PQ16  -  [PRPAK5X6_5]  91.69 211.84 270 top
PQ17  -  [PRPAK5X6_4_2]  115.44 211.84 90 top
PQ18  -  [PRPAK5X6_3_2]  107.57 211.84 270 top
PQ19  -  [PRPAK5X6_1_4]  167 209.89 180 top
PQ28  -  [PRPAK5X6_1_5]  33.27 132.33 180 top
PQ29  -  [PRPAK5X6_3]  33.27 124.46 0 top
PQ30  -  [PRPAK5X6_6]  169.08 47.07 90 top
PQ31  -  [PRPAK5X6_6_1]  169.08 39.07 90 top
PQ33  -  [PRPAK5X6_2_2]  161.42 187.66 90 top
PQ34  -  [PRPAK5X6_4]  160.53 180.68 0 top
PQ44  -  [SOT23_125_18]  39.5 202.56 270 top
PR16  -  [R0402_3_72]  94.49 96.65 270 top
PR17  -  [R0402_3_73]  84.84 100.92 180 top
PR18  -  [R0402_2_99]  166.75 140.54 0 top
PR19  -  [R0402_1_84]  162.6 102.57 270 top
PR20  -  [R0402_112]  159.64 151.59 180 top
PR21  -  [R0402_2_104]  161.2 89.74 0 top
PR22  -  [R0402_2_103]  161.2 90.89 0 top
PR23  -  [R0402_76]  99.48 31.07 90 top
PR24  -  [R0402_2_36]  97.07 31.07 270 top
PR25  -  [R0402_97]  64.26 197.36 180 top
PR26  -  [ISEN_SHORTNI_5]  43.36 146.21 270 top
PR27  -  [ISEN_SHORTNI_4]  42.85 146.21 270 top
PR28  -  [R0603_2_5]  40.51 146.56 180 top
PR29  -  [ISEN_SHORTNI_2]  42.85 162.1 270 top
PR30  -  [ISEN_SHORTNI_3]  43.36 162.1 270 top
PR31  -  [R0603_2_6]  40.51 162.43 180 top
PR32  -  [R0603_3_1]  32.77 144.27 180 top
PR33  -  [R0603_3_2]  38.86 150.37 180 top
PR34  -  [R0603_3_3]  31.12 136.4 180 top
PR35  -  [R0603_3_4]  32.77 160.15 180 top
PR36  -  [R0603_3_5]  38.86 166.24 180 top
PR37  -  [R0603_3_6]  31.12 152.27 180 top
PR38  -  [R0603_3_7]  32.77 176.02 180 top
PR39  -  [ISEN_SHORTNI]  42.85 177.97 270 top
PR40  -  [ISEN_SHORTNI_1]  43.36 177.97 270 top
PR41  -  [R0603_1_6]  38.86 182.12 180 top
PR42  -  [R0603_1_7]  40.51 178.31 180 top
PR43  -  [R0603_3_8]  31.12 168.15 180 top
PR44  -  [R0603_2_7]  79.63 211.84 90 top
PR45  -  [ISEN_SHORTNI_1_1]  70.31 208.32 270 top
PR46  -  [ISEN_SHORTNI_1_2]  70.82 208.32 270 top
PR47  -  [R0603_1_8]  85.72 206.25 90 top
PR48  -  [R0603_1_9]  81.92 204.6 90 top
PR49  -  [R0603_2_8]  71.75 214 90 top
PR50  -  [R0603_2_9]  95.63 211.84 90 top
PR51  -  [ISEN_SHORTNI_1_5]  87.25 201.04 90 top
PR52  -  [ISEN_SHORTNI_1_6]  87.76 201.04 90 top
PR53  -  [R0603_1_10]  101.73 206.25 90 top
PR54  -  [R0603_4]  97.92 204.6 90 top
PR55  -  [R0603_2_10]  87.76 214 90 top
PR56  -  [R0603_2_11]  111.51 211.84 90 top
PR57  -  [ISEN_SHORTNI_1_4]  103.63 201.04 90 top
PR58  -  [ISEN_SHORTNI_1_3]  103.12 201.04 90 top
PR59  -  [R0603_1_11]  117.6 206.25 90 top
PR60  -  [R0603_2_12]  103.63 214 90 top
PR61  -  [R0603_1_12]  113.79 204.6 90 top
PR62  -  [ISEN_SHORTNI_2_1]  42.85 135.63 270 top
PR63  -  [ISEN_SHORTNI_2_2]  43.36 135.63 270 top
PR125  -  [R0402_116]  34.29 114.76 90 top
PR126  -  [R0402_3_69]  31.5 111.21 270 top
PR127  -  [R0402_2_29]  166.16 33.48 180 top
PR128  -  [R0402_2_23]  169.71 30.69 0 top
PR129  -  [R0402_1_16]  158.24 205.31 90 top
PR130  -  [R0402_103]  45.21 201.3 0 top
PR131  -  [R0402_87]  155.96 205.31 90 top
PR133  -  [R0402_2_85]  42.8 196.22 0 top
PR134  -  [R0402_2_76]  42.8 195.07 0 top
PR135  -  [R0402_2_84]  42.8 197.36 0 top
PR136  -  [R0402_2_77]  42.8 193.93 0 top
PR137  -  [R0402_96]  66.8 197.36 180 top
PR138  -  [R0402_98]  66.8 195.58 180 top
PR139  -  [R0402_2_74]  47.62 203.84 0 top
PR140  -  [R0402_1_38]  55.75 207.9 90 top
PR141  -  [R0402_1_37]  53.21 207.9 90 top
PR142  -  [R0402_1_40]  50.67 207.9 90 top
PR143  -  [R0402_1_36]  58.29 207.9 90 top
PR144  -  [R0402_1_34]  60.83 207.9 90 top
PR145  -  [R0402_1_45]  62.36 211.2 90 top
PR146  -  [R0402_1_46]  63.63 211.2 90 top
PR147  -  [R0402_1_47]  64.9 211.2 90 top
PR148  -  [R0402_1_42]  63.63 208.66 90 top
PR149  -  [R0402_1_43]  64.9 208.66 90 top
PR150  -  [R0402_1_44]  64.26 206.76 0 top
PR151  -  [R0402_2_67]  64.26 194.44 0 top
PR152  -  [R0402_3_48]  56.52 193.8 270 top
PR182  -  [R0402_1_63]  35.34 111.22 90 top
PR183  -  [R0402_3_15]  166.73 29.48 270 top
PR184  -  [R0402_86]  157.1 205.31 90 top
PR193  -  [R0402_46]  63.67 22.43 90 top
PR194  -  [R0402_3_37]  62.91 33.61 0 top
PR195  -  [R0402_2_47]  62.91 32.34 180 top
PR199  -  [R0402_2_37]  62.4 22.43 90 top
PR214  -  [R0402_1_21]  38.23 148.46 90 top
PR215  -  [R0402_1_22]  38.23 164.34 90 top
PR216  -  [R0402_1_20]  38.23 180.21 90 top
PR217  -  [R0402_2_98]  83.82 206.88 0 top
PR218  -  [R0402_2_97]  99.82 206.88 0 top
PR219  -  [R0603_3_9]  58.8 190.63 180 top
PR220  -  [R0603_1_13]  48.01 210.95 270 top
PR221  -  [R0402_2_96]  115.7 206.88 0 top
PR224  -  [R0603_5]  38.86 151.89 0 top
PR225  -  [R0603_6]  38.86 167.77 0 top
PR226  -  [R0603_7]  38.86 183.64 0 top
PR227  -  [R0402_92]  66.8 199.77 180 top
PR228  -  [R0603_2_13]  87.25 206.25 270 top
PR229  -  [R0402_91]  66.8 201.04 180 top
PR230  -  [R0603_8]  103.25 206.25 270 top
PR231  -  [R0603_1_14]  119.13 206.25 270 top
PR233  -  [R0603_9]  47.88 199.77 0 top
PR240  -  [R0402_2_58]  54.48 207.9 90 top
PR241  -  [R0402_88]  55.12 211.84 180 top
PR242  -  [R0402_1_39]  51.94 207.9 90 top
PR243  -  [R0402_3_47]  52.58 211.84 180 top
PR244  -  [R0402_2_59]  49.4 207.9 90 top
PR245  -  [R0402_2_60]  50.04 211.84 180 top
PR246  -  [R0402_3_45]  57.02 207.9 90 top
PR247  -  [R0402_3_46]  57.66 211.84 180 top
PR248  -  [R0402_1_35]  59.56 207.9 90 top
PR249  -  [R0402_1_41]  60.2 211.84 180 top
PR250  -  [R0402_2_72]  57.66 193.8 270 top
PR251  -  [R0402_100]  59.94 192.66 90 top
PR341  -  [R0402_93]  64.26 199.77 180 top
PR343  -  [R0402_90]  64.26 201.04 180 top
PR344  -  [R0402_3_50]  37.97 189.36 0 top
PR348  -  [R0402_94]  66.8 198.5 180 top
PR349  -  [R0402_89]  66.8 205.61 0 top
PR350  -  [R0402_95]  64.26 198.5 180 top
PR364  -  [R0402_2_65]  68.58 203.96 270 top
PR365  -  [R0402_1_48]  66.8 206.76 0 top
PR369  -  [R0402_2_71]  66.8 192.15 0 top
PR371  -  [R0402_2_70]  64.26 191.01 0 top
PR372  -  [R0402_2_69]  64.26 192.15 0 top
PR376  -  [R0402_2_73]  59.44 194.44 0 top
PR380  -  [R0402_2_66]  66.8 203.33 0 top
PR382  -  [R0402_2_79]  42.8 201.3 0 top
PR389  -  [R0402_2_81]  42.8 202.44 0 top
PR390  -  [R0402_2_80]  47.62 201.3 0 top
PR398  -  [R0402_2_83]  45.21 198.5 0 top
PR399  -  [R0402_3_49]  47.62 198.5 0 top
PR400  -  [R0402_2_94]  37.97 190.5 0 top
PR401  -  [R0402_3_51]  35.56 190.5 0 top
PR403  -  [R0402_110]  33.15 199.14 90 top
PR408  -  [R0402_1_50]  36.58 202.56 270 top
PU3  -  [SO8_50_150GV_3]  97.41 101.98 0 top
PU4  -  [SO8_50_150GV_3_1]  89.66 101.98 0 top
PU5  -  [SO8_50_150GV]  159.89 145.62 180 top
PU6  -  [SO8_50_150GV_1]  159.89 95.46 180 top
PU7  -  [SO8_50_150GV_1_1]  96.37 25.74 180 top
PU9  -  [SO8_50_150GV_2]  64.3 27.9 0 top
PU10  -  [DFN8_3X3MM-GND]  42.8 149.22 180 top
PU11  -  [DFN8_3X3MM-GND_1]  42.8 165.1 180 top
PU12  -  [DFN8_3X3MM-GND_1_1]  42.8 180.97 180 top
PU13  -  [DFN8_3X3MM-GND_1_2]  84.58 202.31 90 top
PU14  -  [DFN8_3X3MM-GND_2]  100.58 202.31 90 top
PU15  -  [DFN8_3X3MM-GND_1_3]  116.46 202.31 90 top
PU16  -  [DHVQFN20]  151.26 66.25 180 top
Q6  -  [SOT23-AKAK]  93.51 37.8 180 top
Q8  -  [SOT23_126_5]  18.16 158.12 90 top
Q9  -  [SOT23_126_2]  14.1 153.29 90 top
Q10  -  [SOT23_126_3]  18.16 153.29 90 top
Q11  -  [SOT23_126_4]  14.1 158.12 90 top
Q12  -  [DFN2510P10E]  12.95 166.37 90 top
Q13  -  [DFN2510P10E_1_1]  12.95 163.32 270 top
Q14  -  [SOT23-6P-20051228_1_1]  6.98 154.81 0 top
Q15  -  [DFN2510P10E_2]  89.28 11.39 0 top
Q21  -  [DFN2510P10E_2_1]  95.38 11.39 0 top
Q22  -  [SOT23-6P-20051228_2]  56.13 12.66 180 top
Q23  -  [SOT23-6P-20051228_3]  101.09 12.66 180 top
Q24  -  [SOT23-6P-20051228_4]  72.52 12.66 180 top
Q30  -  [SOT23_125_1]  75.17 29.71 90 top
Q31  -  [SOT23_125]  75.3 25.9 270 top
Q32  -  [SOT23_125_3]  75.17 33.26 270 top
Q33  -  [SOT23_125_13]  39.24 117.68 90 top
Q35  -  [SOT23_125_12]  39.24 114.26 90 top
Q36  -  [SOT23-6P-20051228_2_1]  21.08 108.97 270 top
Q37  -  [SOT23-6P-20051228_2_2]  18.38 134.44 180 top
Q38  -  [SOT23_125_19]  176.53 217.13 90 top
Q39  -  [OT-23-3_L2_9-W1_3-P1_90-LS2_1]  172.47 217.13 0 top
Q49  -  [SOT23_126]  153.76 42.57 90 top
Q50  -  [SOT23_126_1]  153.76 39.14 90 top
Q55  -  [DFN2510P10E_1]  19.3 112.65 90 top
Q59  -  [SOT23_126_8]  165.35 106.13 90 top
Q60  -  [SOT23_125_16]  165.35 99.02 90 top
Q61  -  [SOT23_125_17]  165.35 102.57 90 top
Q62  -  [SOT23_125_4]  89.83 34.63 0 top
Q65  -  [SOT23_125_6]  75.69 98.51 270 top
Q67  -  [SOT23_125_10]  63.12 98.51 270 top
Q69  -  [SOT23_125_14]  168.44 80.85 0 top
Q70  -  [SOT23_125_11]  168.44 84.92 0 top
Q71  -  [SOT23_125_15]  172 80.85 0 top
Q72  -  [SOT23_126_7]  172 84.92 0 top
Q73  -  [SOT23_126_6]  67.31 98.51 90 top
Q74  -  [SOT23_125_7]  71.5 98.51 270 top
Q76  -  [SOT23_125_5]  89.83 28.02 180 top
Q77  -  [DFN2510P10E_1_2]  19.3 116.33 270 top
Q95  -  [SOT23_123]  34.16 202.44 0 top
Q119  -  [SOT23_125_9]  79.88 98.51 270 top
Q120  -  [SOT23_125_8]  84.07 98.51 270 top
Q132  -  [SOT23_123_1]  54.52 35.9 0 top
R6  -  [R0402_2_62]  64.26 202.18 0 top
R7  -  [R0402_2_64]  68.58 201.55 270 top
R8  -  [R0402_2_63]  68.58 199.14 270 top
R9  -  [R0402_2_61]  66.8 202.18 180 top
R10  -  [R0402_1_51]  64.39 107.82 90 top
R11  -  [R0402_1_90]  78.1 33.26 270 top
R12  -  [R0402_1_18]  84.45 107.7 90 top
R14  -  [R0402_3_57]  66.55 107.82 90 top
R15  -  [R0402_3_5]  85.72 107.7 270 top
R17  -  [R0402_3_54]  83.19 107.7 270 top
R18  -  [R0402_3_56]  81.92 107.7 270 top
R19  -  [R0402_3_53]  79.38 107.7 270 top
R20  -  [R0402_3_55]  80.64 107.7 270 top
R21  -  [R0402_3_52]  63.25 107.82 270 top
R22  -  [R0402_1_59]  145.54 144.86 90 top
R23  -  [R0402_3_65]  145.54 214.88 270 top
R24  -  [R0402_3_60]  129.67 212.34 180 top
R25  -  [R0402_1_55]  133.1 212.85 270 top
R26  -  [R0402_111]  129.67 213.49 180 top
R27  -  [R0402_1_58]  145.54 165.31 90 top
R28  -  [R0402_1_60]  145.54 142.32 90 top
R29  -  [R0402_3_68]  145.57 92.67 270 top
R38  -  [R0402_1_12]  114.09 34.88 90 top
R39  -  [R0402_2_26]  117.47 19.77 90 top
R40  -  [R0402_2_27]  116.33 19.77 90 top
R41  -  [R0402_1_68]  120.52 51.26 90 top
R44  -  [R0402_1_69]  119.25 51.26 90 top
R45  -  [R0402_34]  133.73 52.03 0 top
R48  -  [R0402_33]  133.73 50.76 180 top
R49  -  [R0402_2_2]  111.55 24.09 0 top
R50  -  [R0402_41]  92.5 41.1 270 top
R51  -  [R0402_2_33]  94.53 41.1 270 top
R52  -  [R0402_1_56]  172.08 214.71 0 top
R53  -  [R0402_1_93]  94.27 58.63 270 top
R54  -  [R0402_1_94]  63.23 40.61 90 top
R56  -  [R0402_2_102]  115.7 79.97 0 top
R65  -  [R0402_2_95]  33.15 196.6 90 top
R67  -  [R0402_3_62]  177.16 214.71 0 top
R73  -  [R0402_3_61]  169.42 214.71 0 top
R74  -  [R0402_2_1]  145.58 16.47 0 top
R87  -  [R0402_3_63]  174.62 214.71 180 top
R95  -  [R0402_2_3]  97.45 35.9 90 top
R96  -  [R0402_55]  109.26 38.69 180 top
R97  -  [R0402_1_73]  111.67 38.69 180 top
R98  -  [R0402_2_25]  111.55 25.36 0 top
R99  -  [R0402_78]  72.43 21.29 270 top
R100  -  [R0402_44]  99.35 35.26 0 top
R101  -  [R0402_1_72]  111.67 43.9 0 top
R102  -  [R0402_3_1]  99.35 36.4 0 top
R103  -  [R0402_3_67]  167.26 136.1 270 top
R104  -  [R0402_30]  114.09 41.61 180 top
R105  -  [R0402_67]  97.6 47.9 270 top
R106  -  [R0402_2_24]  114.09 43.9 0 top
R107  -  [R0402_64]  96.46 47.9 270 top
R108  -  [R0402_1_85]  146.22 19.64 90 top
R109  -  [R0402_57]  98.74 45.49 90 top
R110  -  [R0402_56]  99.89 45.49 90 top
R115  -  [R0402_1_57]  166.75 165.69 270 top
R116  -  [R0402_58]  104.46 45.49 90 top
R117  -  [R0402_59]  103.32 45.49 90 top
R118  -  [R0402_61]  101.03 45.49 90 top
R119  -  [R0402_60]  102.17 45.49 90 top
R128  -  [R0402_63]  97.6 45.49 270 top
R129  -  [R0402_66]  99.89 47.9 90 top
R130  -  [R0402_65]  98.74 47.9 90 top
R131  -  [R0402_62]  96.46 45.49 270 top
R132  -  [R0402_70]  101.03 47.9 90 top
R133  -  [R0402_68]  104.46 47.9 90 top
R134  -  [R0402_69]  102.17 47.9 90 top
R135  -  [R0402_71]  103.32 47.9 90 top
R138  -  [R0402_1_67]  150.24 35.9 0 top
R139  -  [R0402_2_40]  38.27 28.66 0 top
R140  -  [R0402_2_10]  38.27 25.23 0 top
R144  -  [R0402_1_92]  158.16 13.42 0 top
R145  -  [R0402_3_14]  151.81 13.42 180 top
R163  -  [R0402_1]  150.28 32.47 180 top
R172  -  [R0402_12]  38.27 26.37 0 top
R189  -  [R0402_1_5]  40.81 22.94 180 top
R193  -  [R0402_37]  156.46 42.12 90 top
R194  -  [R0402_3_4]  38.27 22.94 0 top
R195  -  [R0402_6]  40.81 28.66 180 top
R196  -  [R0402_36]  156.46 38.69 90 top
R203  -  [R0402_77]  78.02 23.45 270 top
R204  -  [R0402_72]  96.05 33.74 90 top
R209  -  [R0402_1_86]  71.63 96.09 0 top
R217  -  [R0402_122]  62.48 96.09 0 top
R218  -  [R0402_1_17]  59.94 96.09 180 top
R231  -  [R0402_3_43]  18.92 155.83 180 top
R232  -  [R0402_3_42]  18.92 151 180 top
R233  -  [R0402_1_32]  10.29 155.83 0 top
R234  -  [R0402_3_40]  10.29 154.43 0 top
R235  -  [R0402_1_33]  14.86 151 0 top
R236  -  [R0402_3_41]  10.29 153.03 0 top
R253  -  [R0402_1_29]  28.07 9.91 90 top
R254  -  [R0402_1_31]  22.99 9.91 90 top
R255  -  [R0402_17]  23.37 39.07 180 top
R276  -  [R0402_1_30]  20.45 9.91 90 top
R281  -  [R0402_3_30]  12.32 5.21 180 top
R289  -  [R0603_2_1]  23.37 45.68 180 top
R290  -  [R0402_3_28]  12.32 1.4 180 top
R293  -  [R0402_82]  12.32 2.67 180 top
R294  -  [R0402_81]  12.32 3.94 180 top
R297  -  [R0402_2_9]  40.81 26.37 180 top
R298  -  [R0402_80]  12.32 7.75 180 top
R299  -  [R0402_9]  40.81 25.23 180 top
R305  -  [R0402_3_32]  38.27 27.51 0 top
R306  -  [R0402_1_4]  40.81 27.51 180 top
R337  -  [R0402_11]  38.27 24.09 0 top
R338  -  [R0402_10]  40.81 24.09 180 top
R368  -  [R0402_1_65]  95.63 96.65 90 top
R369  -  [R0402_2_49]  77.98 101.05 0 top
R370  -  [R0402_102]  40.39 195.07 180 top
R371  -  [R0402_2_101]  77.98 96.09 0 top
R372  -  [R0402_74]  72.38 29.71 270 top
R373  -  [R0402_1_91]  101.01 38.94 270 top
R374  -  [R0402_3_23]  101.01 41.36 270 top
R375  -  [R0402_1_87]  98.72 41.99 180 top
R376  -  [R0402_79]  12.32 9.02 180 top
R390  -  [R0402_50]  72.38 33.26 90 top
R391  -  [R0402_2_34]  78.02 25.99 90 top
R392  -  [R0402_3_70]  37.85 108.67 270 top
R393  -  [R0402_118]  36.58 118.19 90 top
R425  -  [R0402_1_79]  158.75 11.51 90 top
R426  -  [R0402_1_76]  152.4 11.51 90 top
R428  -  [R0402_1_78]  151.13 11.51 90 top
R495  -  [R0402_3_26]  88.81 31.32 270 top
R496  -  [R0402_3_27]  90.08 31.32 270 top
R507  -  [R0402_73]  91.35 31.32 270 top
R520  -  [R0402_1_64]  95.89 107.7 0 top
R521  -  [R0402_121]  95.89 106.55 0 top
R522  -  [R0402_2_48]  75.44 101.05 180 top
R525  -  [R0402_PP]  88.27 107.7 0 top
R526  -  [R0402_PP_1]  88.27 106.55 0 top
R548  -  [R0402_3_66]  161.42 150.96 270 top
R549  -  [R0402_3_82]  162.6 106.13 90 top
R550  -  [R0402_1_83]  168.06 102.57 90 top
R551  -  [R0402_1_19]  168.06 98.51 90 top
R556  -  [R0402_3_24]  97.07 20.66 270 top
R557  -  [R0402_45]  99.48 20.66 90 top
R572  -  [R0402_2_90]  37.97 197.36 0 top
R573  -  [R0402_2_93]  37.97 191.64 0 top
R574  -  [R0402_109]  37.97 192.79 180 top
R575  -  [R0402_2_92]  37.97 193.93 0 top
R576  -  [R0402_105]  45.21 202.44 180 top
R577  -  [R0402_106]  42.8 198.5 180 top
R578  -  [R0402_2_87]  40.39 197.36 0 top
R579  -  [R0402_104]  47.62 202.44 180 top
R580  -  [R0402_2_88]  40.39 198.5 0 top
R581  -  [R0402_1_49]  42.8 199.77 0 top
R582  -  [R0402_2_91]  37.97 196.22 180 top
R583  -  [R0402_2_78]  40.39 193.93 0 top
R584  -  [R0402_2_86]  40.39 196.22 180 top
R585  -  [R0402_107]  40.39 192.79 180 top
R586  -  [R0402_2_75]  45.21 203.84 0 top
R587  -  [R0402_108]  37.97 195.07 180 top
R588  -  [R0402_2_82]  40.39 199.77 180 top
R589  -  [R0402_101]  42.8 203.84 0 top
R590  -  [R0402_2_89]  40.39 191.64 0 top
R591  -  [R0402_75]  78.1 29.71 90 top
R592  -  [R0402_2_68]  64.26 195.58 180 top
R593  -  [R0402_1_77]  157.48 11.51 90 top
R594  -  [R0402_99]  68.58 193.8 90 top
R610  -  [R0402_1_61]  30.23 111.21 90 top
R611  -  [R0402_1_62]  32.77 111.21 90 top
R612  -  [R0402_117]  36.58 114.76 270 top
R613  -  [R0402_2_30]  166.16 34.63 0 top
R614  -  [R0402_3_64]  159.38 205.31 270 top
R625  -  [R0402_1_66]  84.84 96.09 0 top
R681  -  [R0402_3_77]  169.84 88.47 90 top
R682  -  [R0402_3_75]  167.43 77.55 270 top
R683  -  [R0402_3_76]  168.57 88.47 90 top
R684  -  [R0402_3_78]  171.11 88.47 90 top
R685  -  [R0402_1_81]  171.11 77.55 270 top
R686  -  [R0402_3_79]  172.38 88.47 90 top
R788  -  [R0402_1_52]  127.76 215.39 90 top
R789  -  [R0402_3_58]  130.3 215.39 90 top
R790  -  [R0402_1_53]  129.03 215.39 270 top
R791  -  [R0402_1_54]  131.7 215.39 90 top
R794  -  [R0402_3_59]  133.1 215.39 270 top
SATA3  -  [SATA_D_AKL]  138.01 6.17 0 top
SATA4  -  [SATA_D_AKL_1]  117.6 6.17 0 top
SC11  -  [C0402_54]  45.76 35.13 270 top
SC14  -  [C0402_2_37]  51.86 21.29 90 top
SC20  -  [C0402_1_77]  53 21.29 90 top
SC21  -  [C0402_55]  43.35 30.05 0 top
SC37  -  [C0402_56]  49.7 35.13 270 top
SC121  -  [C0402_57]  47.92 37.55 90 top
SR18  -  [R0402_2_43]  52.11 35.13 270 top
SR19  -  [R0402_3_36]  50.97 35.13 270 top
SR20  -  [R0402_47]  47.92 18.75 90 top
SR21  -  [R0402_83]  49.32 18.75 90 top
SR22  -  [R0402_84]  50.46 18.75 90 top
SR27  -  [R0402_3_81]  165.27 96.48 0 top
SR28  -  [R0402_2_41]  40.81 31.71 0 top
SR29  -  [R0402_3_35]  57.7 30.56 0 top
SR30  -  [R0402_2_46]  40.81 33.99 0 top
SR31  -  [R0402_2_44]  40.81 37.42 0 top
SR36  -  [R0402_2_39]  44.36 37.55 270 top
SR38  -  [R0402_1_71]  57.7 29.42 180 top
SR40  -  [R0402_2_5]  40.81 32.85 0 top
SR44  -  [R0402_3_34]  57.7 28.28 180 top
SR45  -  [R0402_2_8]  43.35 26.37 180 top
SR47  -  [R0402_1_89]  49.32 21.29 90 top
SR50  -  [R0402_85]  40.81 36.28 180 top
SR59  -  [R0402_49]  57.7 33.99 0 top
SR60  -  [R0402_43]  44.36 35.13 90 top
SR61  -  [R0402_38]  48.3 39.45 0 top
SR62  -  [R0402_48]  47.92 21.29 90 top
SR70  -  [R0402_2_45]  40.81 35.13 180 top
SR241  -  [R0402_3_33]  57.7 27.13 180 top
SR242  -  [R0402_8]  43.35 27.51 0 top
SR243  -  [R0402_2_42]  57.7 32.85 180 top
SR244  -  [R0402_2_38]  49.7 37.55 270 top
SR246  -  [R0402_2_7]  43.35 25.24 0 top
SR248  -  [R0402_7]  43.35 28.66 180 top
SR250  -  [R0402_2_6]  43.35 24.1 0 top
SR252  -  [R0402_1_88]  50.46 21.29 90 top
SR258  -  [R0402_39]  52.11 37.55 270 top
SR261  -  [R0402_42]  47.92 35.13 90 top
SR265  -  [R0402_40]  45.76 37.55 90 top
SSD2  -  [SMD-NGFF-75P-M2-H3-LOTES]  122.33 83.52 270 top
SU3  -  [LQFP64_0_4]  50.33 28.28 90 top
SU4  -  [TSSOP20]  40.64 16.47 0 top
TC4  -  [C0402_9]  166.75 141.69 0 top
TC16  -  [C0402_58]  36.58 108.67 90 top
TC17  -  [C0402_2_50]  166.16 31.2 180 top
TC18  -  [C0402_1_79]  167.81 90.63 180 top
TR37  -  [R0402_119]  36.58 111.21 90 top
TR38  -  [R0402_3_22]  165.58 29.48 270 top
TR39  -  [R0402_1_82]  167.17 88.47 270 top
U5  -  [RTL8111G_QFN32]  26.29 73.87 270 top
U12  -  [SM_SOT23_5PIN]  98.72 39.58 0 top
U15  -  [DFN3X3-10-0-5]  157.61 201.63 180 top
U16  -  [DFN3X3-10-0-5_1]  164.85 136.1 0 top
U18  -  [WSON8-8X6MM-9P]  157.23 33.61 90 top
U21  -  [DFN3X3-10-0-5_1_1]  32 114.76 0 top
U22  -  [DFN3X3-10-0-5_2]  169.84 33.1 270 top
U44  -  [SM_SOT23_5PIN_1_1]  75.35 22.43 90 top
U45  -  [SM_SOT23_5PIN_1]  93.64 34.25 90 top
USB1  -  [USB3III]  8.69 114.43 270 top
USB2  -  [USB]  7.74 136.91 270 top
Y1  -  [SMD3225]  110.53 34.88 270 top
YC6  -  [C0402_3]  137.45 53.3 0 top
YC7  -  [C0402_1_4]  137.45 52.03 0 top
YC8  -  [C0603_2_4]  151.42 52.41 180 top
YC9  -  [C0603_2_5]  155.74 52.41 0 top
YC10  -  [C0402_2_51]  107.36 19.77 270 top
YC11  -  [C0402_2_1]  114.09 26.75 180 top
YC12  -  [C0603_2_6]  159.15 27.07 270 top
YC13  -  [C0402_1]  126.02 17.99 180 top
YC21  -  [C0603_2_7]  160.54 27.07 270 top
YC23  -  [C0603_1_2]  151.42 53.93 180 top
YC24  -  [C0603_1_3]  155.74 53.93 0 top
YC25  -  [C0402_1_3]  137.45 50.76 0 top
YC31  -  [C0402_3_3]  104.43 19.77 270 top
YC35  -  [C0603_2_2]  102.02 19.64 270 top
YC36  -  [C0402]  150.24 30.18 0 top
YC38  -  [C0603_1_1]  130.43 53.3 180 top
YC39  -  [C0402_3_2]  130.17 52.03 180 top
YC40  -  [C0402_3_1]  130.17 50.76 180 top
YC41  -  [C0402_2_3]  145.07 19.64 270 top
YC42  -  [C0402_1_1]  143.93 19.64 270 top
YC43  -  [C0603_2_8]  161.94 27.07 270 top
YC44  -  [C0402_2_38]  114.72 19.77 270 top
YC45  -  [C0402_3_4]  103.29 19.77 270 top
YC46  -  [C0402_2_4]  146.84 52.69 0 top
YC47  -  [C0402_4]  143.98 52.69 180 top
YC48  -  [C0402_1_5]  146.84 53.89 0 top
YC49  -  [C0402_1_2]  143.98 53.89 180 top
YC50  -  [C0603_2_3]  106.09 23.45 180 top
YC51  -  [C0603_2_1]  102.8 23.43 0 top
YC59  -  [C0402_3_53]  60.42 40.48 90 top
YC60  -  [C0402_3_52]  59.23 40.48 90 top
YR4  -  [R0402_1_15]  114.09 30.31 180 top
YR5  -  [R0402_1_13]  109.01 30.31 180 top
YR6  -  [R0402_1_14]  111.55 30.31 0 top
YR39  -  [R0402_54]  109.26 40.21 180 top
YR42  -  [R0402_31]  111.67 41.61 180 top
YR43  -  [R0402_53]  109.26 41.61 0 top
YR44  -  [R0402_24]  114.09 40.21 180 top
YR45  -  [R0402_3_12]  150.24 34.75 180 top
YR47  -  [R0402]  111.55 26.75 180 top
YR48  -  [R0402_4]  111.55 22.94 180 top
YR54  -  [R0402_20]  150.24 38.06 180 top
YR55  -  [R0402_21]  150.24 39.2 180 top
YR57  -  [R0402_2]  143.04 16.47 0 top
YR58  -  [R0402_3]  143.04 17.74 0 top
YR59  -  [R0402_1_3]  140.88 19.64 90 top
YR60  -  [R0402_1_1]  145.58 17.74 0 top
YR61  -  [R0402_1_75]  125.48 19.77 90 top
YR62  -  [R0402_2_32]  124.33 19.77 90 top
YR63  -  [R0402_3_17]  111.55 31.58 180 top
YR64  -  [R0402_1_74]  126.62 19.77 90 top
YR65  -  [R0402_3_16]  114.09 31.58 0 top
YR66  -  [R0402_3_2]  113.55 19.77 90 top
YR67  -  [R0402_3_3]  112.41 19.77 90 top
YR68  -  [R0402_2_31]  123.19 19.77 90 top
YR69  -  [R0402_5]  150.24 43.77 180 top
YR70  -  [R0402_23]  150.24 42.63 180 top
YR71  -  [R0402_19]  150.24 44.91 180 top
YR72  -  [R0402_18]  150.24 46.06 180 top
YR76  -  [R0402_3_18]  118.62 19.77 270 top
YR77  -  [R0402_3_19]  119.76 19.77 270 top
YR79  -  [R0402_114]  148.34 69.55 180 top
YR82  -  [R0402_22]  150.24 41.48 180 top
YR87  -  [R0402_27]  114.09 21.67 180 top
YR92  -  [R0402_26]  114.09 22.94 180 top
YR111  -  [R0402_2_22]  150.24 40.34 0 top
YR128  -  [R0402_3_20]  122.05 19.77 270 top
YR129  -  [R0402_3_21]  120.9 19.77 270 top
YR131  -  [R0402_32]  111.17 19.77 270 top
YR135  -  [R0402_29]  111.55 29.04 180 top
YR137  -  [R0402_3_13]  150.24 33.61 180 top
YR138  -  [R0402_2_35]  106.09 19.77 270 top
YR139  -  [R0402_28]  114.09 29.17 180 top
YR140  -  [R0402_2_28]  109.9 19.77 270 top
YR141  -  [R0402_2_4]  108.63 19.77 270 top
YR145  -  [R0402_52]  109.01 31.58 180 top
YR175  -  [R0402_25]  114.09 38.69 180 top
YR176  -  [R0402_1_2]  109.01 22.94 180 top
YR178  -  [R0402_51]  109.26 43.9 180 top
YY1  -  [XTAL_CYLINDER_DH]  103.67 32.72 0 top

## Library data of the parts
AC4 = C0603_2
AC5 = C0603_1_8
AC6 = C0603_1_4
AC7 = C0402_11
AC8 = C0402_1_70
AC11 = C0402_1_73
AC12 = C0402_1_71
AC13 = C0603_1_9
AC14 = C0603_1_7
AC15 = C0603_1
AC16 = C0402_1_72
AC17 = C0402_1_69
AC18 = C0603
AC19 = C0402_5
AC20 = C0402_2_6
AC21 = C0603_2_9
AC22 = C0603_1_10
AC23 = C0603_1_11
AC24 = C0402_2_12
AC25 = C0402_2_13
AC26 = C0402_2_5
AC27 = C0603_1_5
AC28 = C0402_2_7
AC29 = C0603_1_6
AC30 = C0603_3_3
AC104 = C0603_3_2
AC105 = C0603_3_1
AFB1 = FB0603_2_1
AFB8 = FB0603
AFB9 = FB0603_1_1
AFB12 = FB0603_2_2
AR2 = R0402_16
AR3 = R0402_1_11
AR4 = R0402_2_11
AR5 = R0402_2_12
AR7 = R0402_13
AR8 = R0402_14
AR9 = R0402_3_10
AR36 = R0402_1_10
AR48 = R0402_3_29
AR49 = R0402_3_31
AR71 = R0402_1_7
AR73 = R0402_2_17
AR74 = R0402_3_6
AR75 = R0402_3_9
AR79 = R0402_3_7
AR80 = R0402_3_8
AR82 = R0402_2_21
AR85 = R0402_2_18
AR86 = R0402_15
AR88 = R0402_1_8
AR89 = R0402_2_19
AR90 = R0402_2_16
AR92 = R0402_2_13
AR93 = R0402_3_11
AR94 = R0402_2_20
AR97 = R0402_2_15
AR98 = R0402_1_6
AR103 = R0402_2_14
AR104 = R0402_1_9
ATXPWR1 = POWER-PSU-20051014
ATXPWR2 = POWER-2X4P_NHOLD
AU1 = LQFP48
AU4 = QFN60P_7X7MM_GND
AUDIO = AUDIO_V
BAT2 = BAT
BYC3 = C0402_1_80
BYC4 = C0402_2
C1 = C0603_2_31
C2 = C0603_1_12
C3 = C0603_2_26
C4 = C0603_2_10
C5 = C0603_2_32
C6 = C0603_2_45
C7 = C0603_1_13
C8 = C0603_1_14
C9 = C0603_9
C10 = C0603_2_38
C11 = C0603_2_27
C12 = C0603_1_15
C13 = C0603_2_25
C14 = C0603_1_16
C15 = C0603_1_17
C16 = C0603_2_34
C17 = C0603_2_30
C18 = C0603_1_18
C19 = C0603_3_6
C20 = C0603_1_19
C21 = C0603_2_24
C22 = C0603_1_20
C23 = C0603_2_28
C24 = C0603_1_21
C25 = C0603_1_22
C26 = C0603_1_23
C27 = C0603_2_13
C28 = C0603_1_24
C29 = C0603_1_25
C30 = C0603_1_26
C31 = C0603_2_12
C32 = C0603_2_29
C33 = C0603_2_33
C34 = C0603_2_39
C35 = C0603_2_48
C36 = C0603_1_27
C37 = C0603_2_41
C38 = C0603_2_40
C40 = C0603_1_28
C41 = C0603_1_29
C42 = C0603_2_23
C43 = C0603_1_30
C44 = C0603_1_31
C45 = C0603_1_32
C46 = C0603_2_11
C48 = C0603_2_47
C49 = C0603_2_42
C50 = C0603_2_46
C51 = C0603_1_33
C52 = C0603_1_34
C53 = C0603_2_43
C54 = C0603_2_44
C55 = C0603_1_35
C56 = C0603_1_36
C57 = C0603_1_37
C58 = C0603_1_38
C59 = C0603_1_39
C60 = C0603_2_15
C61 = C0603_10
C62 = C0603_1_40
C63 = C0603_11
C64 = C0603_12
C65 = C0603_1_41
C66 = C0402_2_24
C67 = C0402_1_57
C68 = C0603_1_42
C69 = C0603_1_43
C70 = C0402_3_27
C71 = C0402_1_63
C72 = C0402_3_28
C73 = C0402_3_26
C74 = C0402_3_30
C75 = C0603_13
C76 = C0603_1_44
C77 = C0603_2_16
C78 = C0402_3_29
C79 = C0402_3_36
C80 = C0603_1_45
C81 = C0402_3_37
C82 = C0603_1_46
C83 = C0603_1_47
C84 = C0402_1_61
C85 = C0402_3_32
C86 = C0402_3_34
C87 = C0402_1_62
C88 = C0402_3_31
C89 = C0603_2_14
C90 = C0603_2_17
C91 = C0603_1_48
C92 = C0402_1_64
C93 = C0402_3_35
C94 = C0603_2_19
C95 = C0402_1_67
C98 = C0402_2_39
C99 = C0402_12
C100 = C0402_3_49
C101 = C0603_3
C102 = C0603_1_49
C103 = C0402_2_2
C104 = C0603_2_35
C105 = C0603_1_50
C106 = C0603_1_51
C107 = C0603_3_7
C108 = C0603_1_52
C109 = C0603_1_53
C110 = C0603_2_36
C111 = C0603_2_37
C141 = C0402_3_50
C187 = C0402_2_55
C188 = C0402_2_54
C194 = C0402_13
C195 = C0402_14
C196 = C0402_15
C197 = C0402_16
C198 = C0402_17
C199 = C0402_18
C200 = C0402_19
C201 = C0402_20
C202 = C0402_21
C221 = C0603_1_54
C223 = C0603_2_21
C224 = C0603_1_55
C225 = C0402_1_46
C226 = C0603_14
C227 = C0402_22
C228 = C0402_3_47
C229 = C0402_2_32
C230 = C0402_23
C231 = C0402_24
C232 = C0603_3_8
C233 = C0402_3_46
C234 = C0402_2_31
C235 = C0402_1_74
C236 = C0402_1_75
C237 = C0402_3_43
C238 = C0402_3_42
C239 = C0402_3_45
C240 = C0402_3_44
C241 = C0603_1_56
C242 = C0603_1_57
C243 = C0402_2_14
C244 = C0402_2_15
C245 = C0603_2_22
C246 = C0402_3_7
C273 = C0402_25
C274 = C0603_3_9
C313 = C0402_2_56
C314 = C0402_2_52
C319 = C0402_2_35
C320 = C0402_26
C321 = C0402_27
C322 = C0402_2_36
C323 = C0402_28
C324 = C0402_29
C325 = C0402_1_47
C326 = C0402_2_33
C327 = C0402_30
C328 = C0402_31
C329 = C0402_6
C330 = C0603_3_10
C333 = C0402_3_6
C334 = C0402_8
C350 = C0402_2_34
C358 = C0603_15
C359 = C0603_1_58
